# Altium PCB Pukk MVP Controller_PCB-v1.0.PcbDoc
Units mm, origin at the board's own origin, x right, y up, seen from the top; angles counter-clockwise.
Board outline 37 x 23 mm, 2 copper layers (Top Layer, Bottom Layer), stack 1.57 mm thick; 12 components, 10 nets, 29 pads, 3 vias.
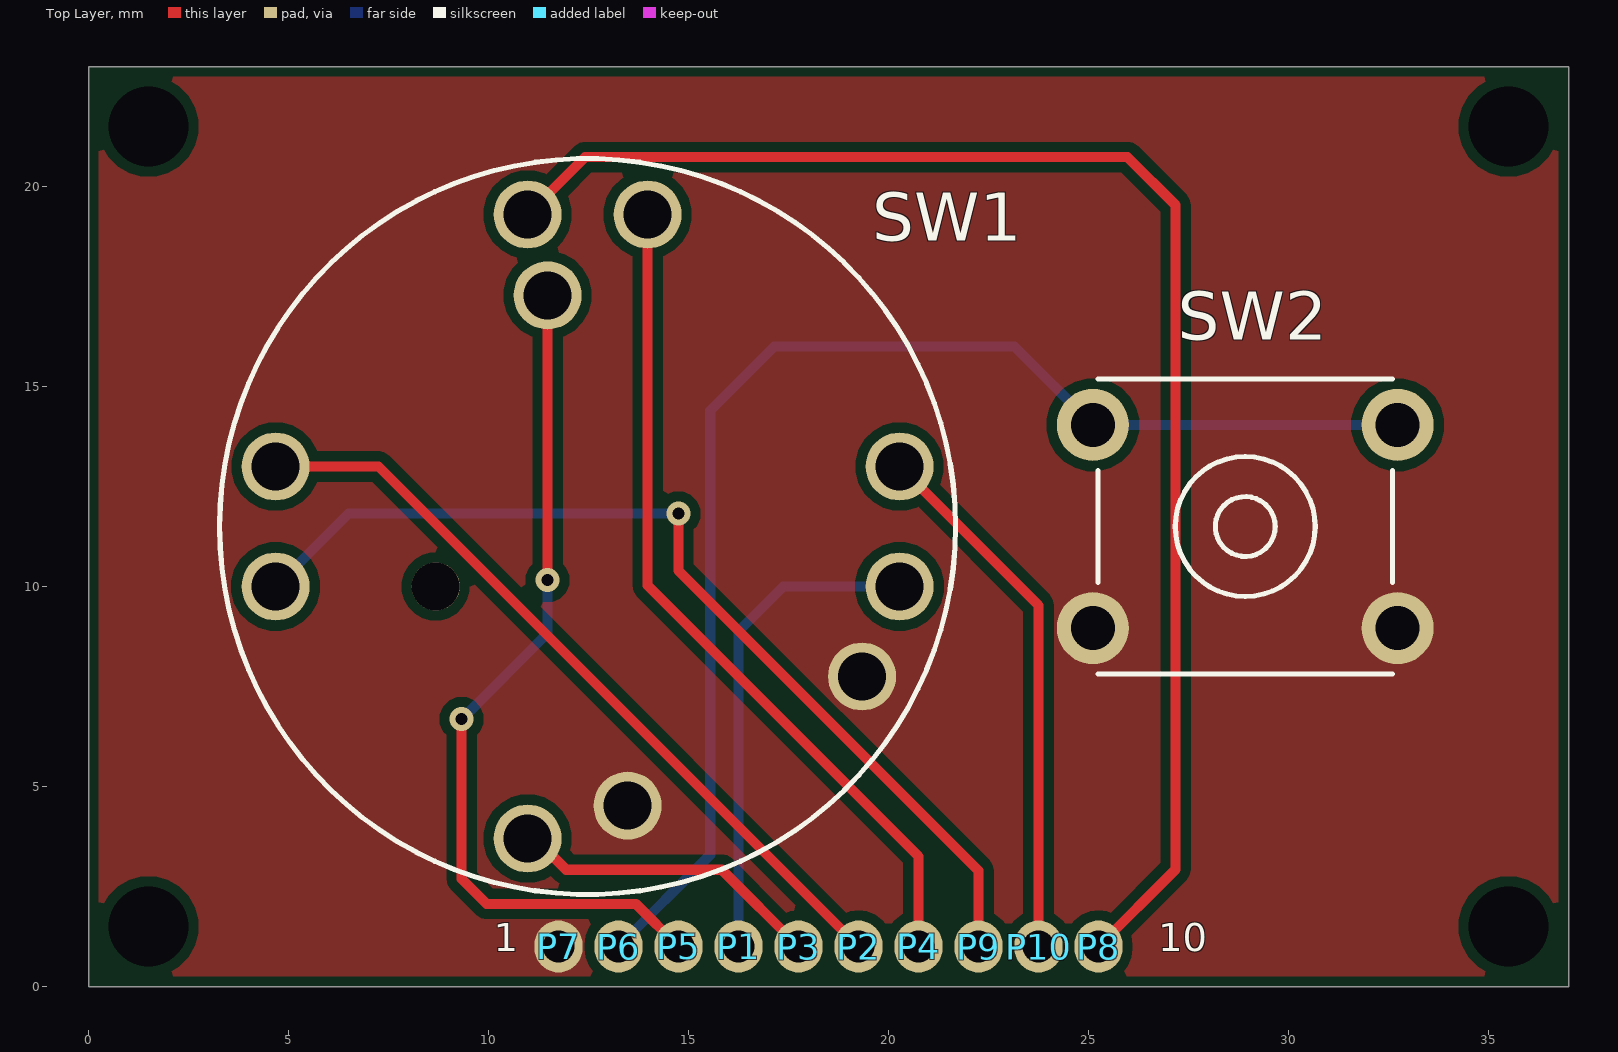
[diagram p0: Top Layer view]
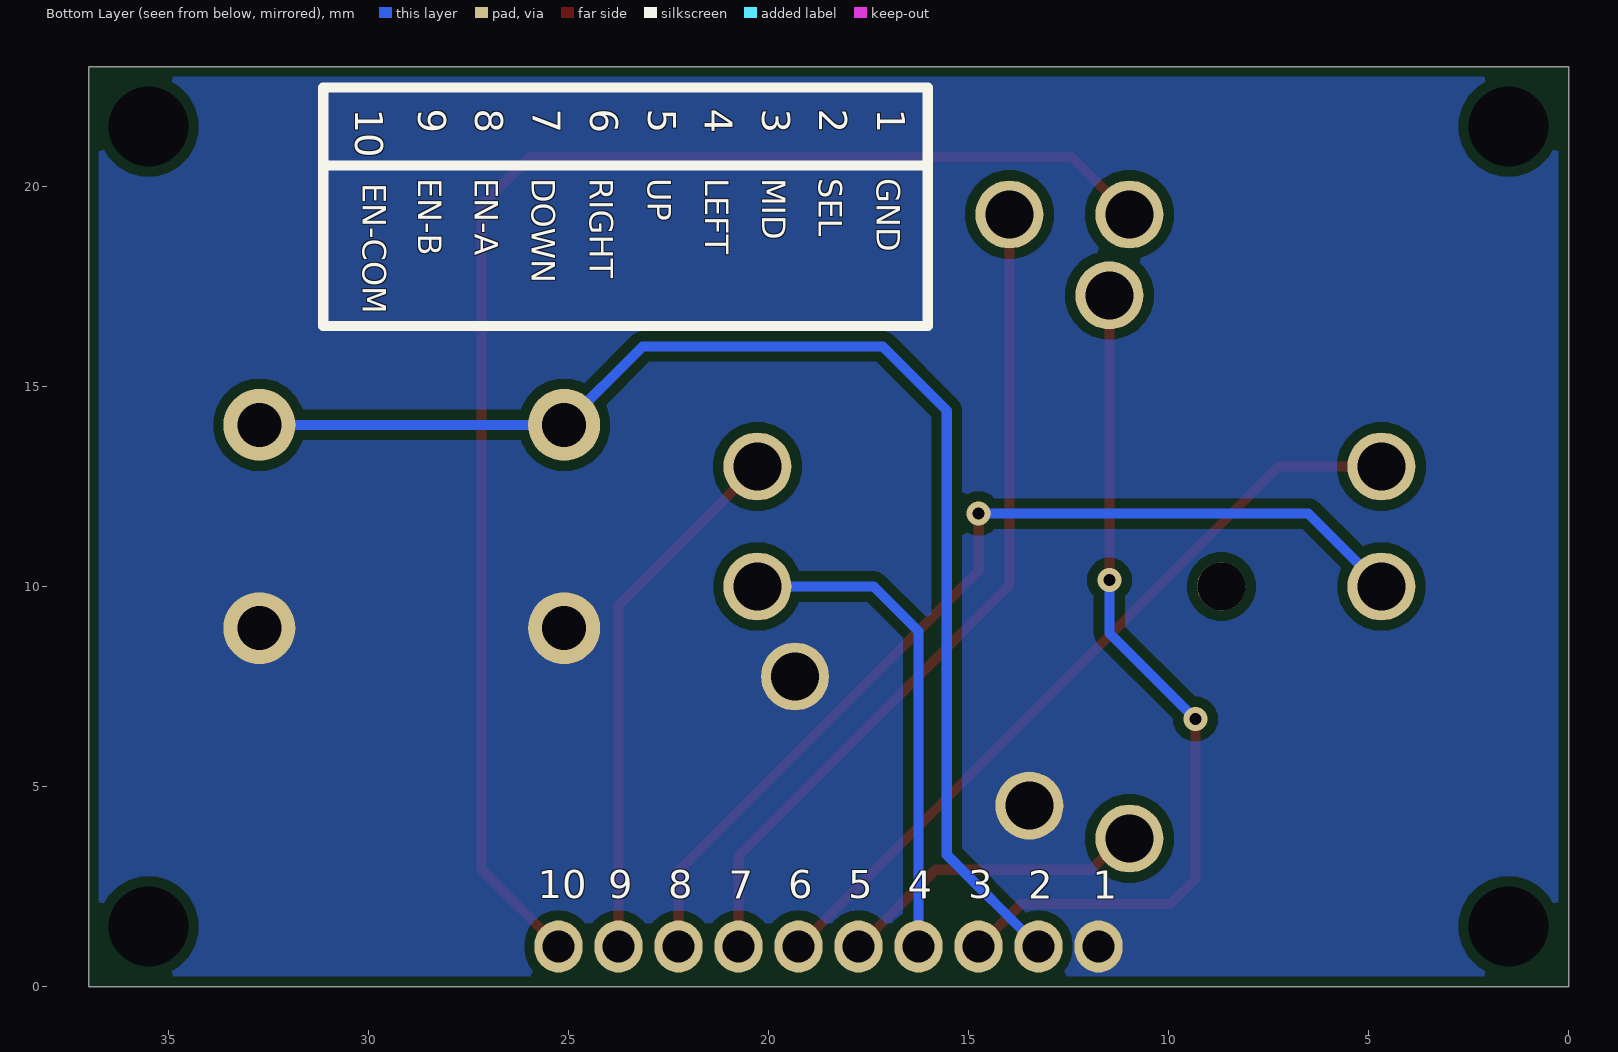
[diagram p1: Bottom Layer view, seen from below]

## Layer stack, top to bottom
Top Solder: solder mask 0.0102, Solder Resist, Dk 3.5
Top Layer: signal copper 0.035
Dielectric 1: dielectric 1.5, FR-4, Dk 4.8
Bottom Layer: signal copper 0.035
Bottom Solder: solder mask 0.0102, Solder Resist, Dk 3.5

## Board outline
0,0 0,23 37,23 37,0

## Design rules (kind name [scope] priority, off if disabled: settings)
BoardOutlineClearance [All] p1: gap=0 ignorepadtopadclearanceinfootprint=FALSE except(0.254: Poly-OutlineEdge)
Clearance [All] p1: gap=0.254 ignorepadtopadclearanceinfootprint=FALSE except(0: Arc-Hole Track-Hole SMDPad-Hole THPad-Hole Via-Hole Fill-Hole Poly-Hole Region-Hole Text-Hole)
Height [All] p1: minheight=0 maxheight=40 prefheight=12.7
HoleToHoleClearance [All] p1: gap=0 allowstackedmicrovias=TRUE
MinimumSolderMaskSliver [All] p1: minsoldermaskwidth=0
PolygonConnect [All] p1: connectstyle=Direct reliefconductorwidth=0.254 reliefentries=4 polygonreliefangle="90 Angle" airgapwidth=0.254
RoutingVias [All] p1: holewidth=0.3 width=0.6 viastyle="Through Hole" minholewidth=0.3 minwidth=0.6 maxholewidth=0.3 maxwidth=0.6
SilkToSilkClearance [All] p1: silktosilkclearance=0
SilkToSolderMaskClearance [IsPad] p1: minsilkscreentomaskgap=0 clearancetoexposedcopper=TRUE
SolderMaskExpansion [All] p1: expansion=0.102 istentingtop=FALSE
UnRoutedNet [All] p1: checkbadconnections=TRUE
Width [All] p1: maxlimit=0.254 minlimit=0.254 preferedwidth=0.254
24 further rules are at their usual default settings.

## Components (designator, comment, footprint, x,y, rotation, side; value= is the part's Value field where it differs from the comment)
P1 "0.5mm Test Pad" "0.5mm Test Pad"#1 16.25,1 r180 top
P2 "0.5mm Test Pad" "0.5mm Test Pad"#1 19.25,1 r180 top
P3 "0.5mm Test Pad" "0.5mm Test Pad"#1 17.75,1 r180 top
P4 "0.5mm Test Pad" "0.5mm Test Pad"#1 20.75,1 r180 top
P5 "0.5mm Test Pad" "0.5mm Test Pad"#1 14.75,1 r180 top
P6 "0.5mm Test Pad" "0.5mm Test Pad"#1 13.25,1 r180 top
P7 "0.5mm Test Pad" "0.5mm Test Pad"#1 11.75,1 r180 top
P8 "0.5mm Test Pad" "0.5mm Test Pad"#1 25.25,1 r180 top
P9 "0.5mm Test Pad" "0.5mm Test Pad"#1 22.25,1 r180 top
P10 "0.5mm Test Pad" "0.5mm Test Pad"#2 23.75,1 r270 top
SW1 "RKJXT1F42001" RKJXT1F42001 12.478,11.5 r0 top
SW2 "KSL0M512LFT" "KSL0M512 LFT" 28.918,11.5 r180 top

## Footprints (in the part's own frame and the unit in brackets; to place one, negate y for a bottom-side part, rotate by r counter-clockwise, add the part's x,y. Pads: shape width x height; smd on the part's side, far side on the other; paste and mask are expansions set on the pad)
"0.5mm Test Pad"#1 [mm]
  oval 1.2x1.3 hole 0.8: 1(0,0)
"0.5mm Test Pad"#2 [mm]
  oval 1.3x1.2 hole 0.8: 1(0,0)
"KSL0M512 LFT" [mm]
  round 1.8 hole 1.1: 1(-3.81,-2.54) 2(3.81,-2.54) 3(-3.81,2.54) 4(3.81,2.54)
  silkscreen extent -3.68,-3.68 3.68,3.68, body extent -4.47,-3.9 4.49,3.9, height 10.1
RKJXT1F42001 [mm]
  round 1.7 hole 1.2: A(-1.5,-7.8) B(7.8,-1.5) C(1.5,7.8) COM(-1,5.78) D(-7.8,1.5) EN_A(-7.8,-1.5) EN_B(7.8,1.5) EN_COM(-1.5,7.8) GND(6.86,-3.75) PUSH(1,-6.98)
  round 1.2 hole 1.2 unplated: ""(-3.8,-1.5)
  silkscreen extent -9.2,-9.2 9.2,9.2, body extent -8.6,-8.6 8.6,8.6, height 17.4

## Part data
P1 P2 P3 P4 P5 P6 P7 P8 P9 P10: "Test pad"
SW1: "Electromechanical Switch 4-Directional Stick Switch 0.01A Bulk", Manufacturer="Alps Alpine", Supplier Part Number=688-RKJXT1F42001, Category="Pushbutton Switches", ComponentLink1Description=https://datasheet.ciiva.com/16197/rkjxt-16197381.pdf?src-supplier=Onlinecomponents.com, ComponentLink1URL=https://datasheet.ciiva.com/16197/rkjxt-16197381.pdf?src-supplier=Onlinecomponents.com, Item Type=Switch, Manufacturer Part Number=RKJXT1F42001, Pricing="1=8.44, 10=7.1, 25=6.33, 50=6.33, 100=5.99, 250=5.75, 1000=5.75, 10000=5.75 (USD)", RoHS=Yes, Stock=1987, Supplier=Mouser
SW2: "SWITCH TACTILE SPST-NO 0.05A 32V", Manufacturer="ITT C&K", Supplier Part Number=401-1837-ND, ComponentLink1Description=https://datasheet.ciiva.com/2901/ksa-ksl-mkii-2901962.pdf?src-supplier=Digikey, ComponentLink1URL=https://datasheet.ciiva.com/2901/ksa-ksl-mkii-2901962.pdf?src-supplier=Digikey, Item Type="Tactile Switches", Manufacturer Part Number=KSL0M512LFT, Pricing="1=0.84, 10=0.718, 25=0.6684, 100=0.5961, 250=0.55216, 500=0.52152, 1000=0.49338, 2500=0.46016, 5000=0.43804 (USD)", RoHS=Yes, Stock=9888, Supplier=Digikey

## Free pads (board coordinates)
  oval 0x1.524 hole 2 unplated: "MH "(1.5,1.5)
  oval 1.524x0 hole 2 unplated: "MH "(1.5,21.5) "MH "(35.5,21.5) "MH "(35.5,1.5)

## Via types
v1: diameter 0.6, hole 0.3, Top Layer to Bottom Layer, 3 vias

## Nets (pads, with @x,y where several pads share a name; then routed paths per layer and width w, separated by ;. In a path a pad name is that pad's centre, name@x,y a point inside that pad or via, vN(x,y) a via of type N, cw(c..) or ccw(c..) an arc to the next point about the centre after c; other vN are vias at no path point)
BUTTON_CENTER#: P5.1 SW1.COM | length 21.6
  Top Layer w0.254: v1(9.327,6.685) 9.327,2.69 9.951,2.066 13.684,2.066 P5.1 ; v1(11.478,10.16) SW1.COM
  Bottom Layer w0.254: v1(9.327,6.685) 11.478,8.836 v1(11.478,10.16)
BUTTON_DOWN#: P4.1 SW1.C | length 21.1
  Top Layer w0.254: SW1.C 13.978,10.025 20.75,3.253 P4.1
BUTTON_LEFT#: P1.1 SW1.B | length 12.4
  Bottom Layer w0.254: P1.1 16.25,8.884 17.366,10 SW1.B
BUTTON_RIGHT#: P2.1 SW1.D | length 19.5
  Top Layer w0.254: SW1.D 7.25,13 P2.1
BUTTON_SELECT#: P6.1 SW2.1 SW2.2 | length 33
  Bottom Layer w0.254: P6.1 15.543,3.293 15.543,14.4 17.145,16.002 23.146,16.002 SW2.2 SW2.1
BUTTON_UP#: P3.1 SW1.A | length 7.9
  Top Layer w0.254: SW1.A 11.161,3.7 11.94,2.921 15.829,2.921 P3.1
EN_A: P9.1 SW1.EN_A | length 24.8
  Top Layer w0.254: v1(14.746,11.822) 14.746,10.398 22.25,2.894 P9.1
  Bottom Layer w0.254: SW1.EN_A 6.5,11.822 v1(14.746,11.822)
EN_B: P10.1 SW1.EN_B | length 13.4
  Top Layer w0.254: SW1.EN_B 23.75,9.528 P10.1
EN_COM: P8.1 SW1.EN_COM | length 36.6
  Top Layer w0.254: SW1.EN_COM 12.413,20.735 25.975,20.735 27.178,19.532 27.178,2.928 P8.1
GND: P7.1 SW1.GND SW1.PUSH SW2.3 SW2.4
pads on no net: SW1.

## Polygon pours and split planes (outlines as drawn)
GND on Bottom Layer "NONET_L01_P-001" (solid, pour order 0): 0,0 0,23 37,23 37,0
GND on Top Layer "NONET_L01_P-001" (solid, pour order 1): 0,0 0,23 37,23 37,0

## Silkscreen, mask and mechanical layers (free items; w line width, h text height)
Top Overlay:
  text "1" at 10.128,0.64 h1.2
  text "10" at 26.745,0.64 h1.2
Bottom Overlay:
  lines w0.254: 16.017,22.479 16.017,16.51 31.13,16.51 31.13,22.479 ; 16.017,22.479 31.13,22.479 ; 16.017,22.479 16.017,20.528 31.13,20.528 31.13,22.479 ; 16.017,22.479 31.13,22.479
  text "1" at 17.523,21.942 h1.2 r90
  text "2" at 18.969,21.943 h1.2 r90
  text "3" at 20.399,21.942 h1.2 r90
  text "4" at 21.827,21.942 h1.2 r90
  text "5" at 23.245,21.942 h1.2 r90
  text "6" at 24.694,21.942 h1.2 r90
  text "7" at 26.136,21.942 h1.2 r90
  text "8" at 27.575,21.942 h1.2 r90
  text "9" at 28.999,21.942 h1.2 r90
  text "10" at 30.572,21.942 h1.2 r90
  text "GND" at 17.493,20.211 h1 r90
  text "SEL" at 18.938,20.211 h1 r90
  text "MID" at 20.363,20.211 h1 r90
  text "LEFT" at 21.787,20.211 h1 r90
  text "UP" at 23.222,20.211 h1 r90
  text "RIGHT" at 24.668,20.211 h1 r90
  text "DOWN" at 26.114,20.211 h1 r90
  text "EN-A" at 27.544,20.211 h1 r90
  text "EN-B" at 28.963,20.211 h1 r90
  text "EN-COM" at 30.34,20.084 h1 r90
  text "1" at 11.892,1.957 h1.2
  text "2" at 13.506,1.957 h1.2
  text "3" at 15.001,1.97 h1.2
  text "4" at 16.516,1.957 h1.2
  text "5" at 18.005,1.97 h1.2
  text "6" at 19.504,1.97 h1.2
  text "7" at 20.999,1.957 h1.2
  text "8" at 22.503,1.97 h1.2
  text "9" at 24.003,1.97 h1.2
  text "10" at 25.763,1.97 h1.2
Board Outline:
  the board outline again, w0.127
Fabrication (Mech4):
  drawing of 191 lines, arcs and shapes, not listed
  text "Layer" at 60.207,22.733 h1.52
  text "Name" at 70.618,22.733 h1.52
  text "Material" at 94.234,22.733 h1.52
  text "Thickness" at 116.072,22.733 h1.52
  text "Constant" at 132.578,22.733 h1.52
  text "Board Layer Stack" at 147.052,22.733 h1.52
  text "Top Overlay" at 70.618,19.685 h1.52
  text "Top Solder" at 70.618,16.637 h1.52
  text "Solder Resist" at 94.234,16.637 h1.52
  text "0.010mm" at 116.072,16.637 h1.52
  text "3.5" at 132.578,16.637 h1.52
  text "1" at 60.207,13.589 h1.52
  text "Top Layer" at 70.618,13.589 h1.52
  text "0.035mm" at 116.072,13.589 h1.52
  text "Dielectric 1" at 70.618,10.541 h1.52
  text "FR-4" at 94.234,10.541 h1.52
  text "1.500mm" at 116.072,10.541 h1.52
  text "4.8" at 132.578,10.541 h1.52
  text "2" at 60.207,7.493 h1.52
  text "Bottom Layer" at 70.618,7.493 h1.52
  text "0.035mm" at 116.072,7.493 h1.52
  text "Bottom Solder" at 70.618,4.445 h1.52
  text "Solder Resist" at 94.234,4.445 h1.52
  text "0.010mm" at 116.072,4.445 h1.52
  text "3.5" at 132.578,4.445 h1.52
  text "Bottom Overlay" at 70.618,1.397 h1.52
  text "Total board thickness:" at 60.207,-1.651 h1.52
  text "1.590mm" at 116.072,-1.651 h1.52
Drill Drawing:
  circle w0.254: c4.207,59.838 r0.847
  lines w0.254: 3.36,39.941 5.054,39.941 5.054,41.635 3.36,41.635 3.36,39.941 ; 3.36,43.751 3.36,44.175 3.784,44.598 3.36,45.021 3.36,45.445 3.784,45.445 4.207,45.021 4.63,45.445 5.054,45.445 5.054,45.021 4.63,44.598 5.054,44.175 5.054,43.751 4.63,43.751 4.207,44.175 3.784,43.751 3.36,43.751 ; 3.36,47.985 3.784,47.985 3.784,47.561 4.63,47.561 4.63,47.985 5.054,47.985 5.054,48.831 4.63,48.831 4.63,49.255 3.784,49.255 3.784,48.831 3.36,48.831 3.36,47.985 ; 3.36,51.795 3.784,51.795 4.207,51.371 4.63,51.795 5.054,51.795 4.63,52.218 5.054,52.641 4.63,52.641 4.207,53.065 3.784,52.641 3.36,52.641 3.784,52.218 3.36,51.795 ; 3.36,55.181 4.207,55.605 5.054,55.181 4.63,56.028 5.054,56.875 4.207,56.451 3.36,56.875 3.784,56.028 3.36,55.181
  lines w0.381: 1.841,38.798 332.66,38.798 ; 1.841,61.658 332.66,61.658 ; 15.834,34.988 15.834,65.468 ; 29.546,34.988 29.546,65.468 ; 57.478,34.988 57.478,65.468 ; 70.327,34.988 70.327,65.468 ; 88.966,34.988 88.966,65.468 ; 127.054,34.988 127.054,65.468 ; 142.037,34.988 142.037,65.468 ; 160.98,34.988 160.98,65.468 ; 185.611,34.988 185.611,65.468 ; 207.296,34.988 207.296,65.468 ; 241.17,34.988 241.17,65.468 ; 275.044,34.988 275.044,65.468 ; 297.034,34.988 297.034,65.468 ; 1.841,34.988 332.66,34.988 332.66,65.468 1.841,65.468 1.841,34.988
  text "Symbol" at 4.127,62.801 h1.83
  text "Count" at 16.977,62.801 h1.83
  text "Hole Size" at 30.689,62.801 h1.83
  text "Plated" at 58.621,62.801 h1.83
  text "Hole Type" at 71.47,62.801 h1.83
  text "Drill Layer Pair" at 90.109,62.801 h1.83
  text "Via/Pad" at 128.197,62.801 h1.83
  text "Pad Shape" at 143.18,62.801 h1.83
  text "Template" at 162.123,62.801 h1.83
  text "Description" at 186.754,62.801 h1.83
  text "Hole Tolerance (+)" at 208.439,62.801 h1.83
  text "Hole Tolerance (-)" at 242.313,62.801 h1.83
  text "Hole Length" at 276.187,62.801 h1.83
  text "Routed Path Length" at 298.177,62.801 h1.83
  text "1" at 16.977,58.991 h1.52
  text "1.200mm (47.24mil)" at 30.689,58.991 h1.52
  text "NPTH" at 58.621,58.991 h1.52
  text "Round" at 71.47,58.991 h1.52
  text "Top Layer - Bottom Layer" at 90.109,58.991 h1.52
  text "Pad" at 128.197,58.991 h1.52
  text "Rounded" at 143.18,58.991 h1.52
  text "c120hn120" at 162.123,58.991 h1.52
  text "-" at 276.187,58.991 h1.52
  text "-" at 298.177,58.991 h1.52
  text "3" at 16.977,55.181 h1.52
  text "0.300mm (11.81mil)" at 30.689,55.181 h1.52
  text "PTH" at 58.621,55.181 h1.52
  text "Round" at 71.47,55.181 h1.52
  text "Top Layer - Bottom Layer" at 90.109,55.181 h1.52
  text "Via" at 128.197,55.181 h1.52
  text "Rounded" at 143.18,55.181 h1.52
  text "v60h30" at 162.123,55.181 h1.52
  text "-" at 276.187,55.181 h1.52
  text "-" at 298.177,55.181 h1.52
  text "4" at 16.977,51.371 h1.52
  text "1.100mm (43.31mil)" at 30.689,51.371 h1.52
  text "PTH" at 58.621,51.371 h1.52
  text "Round" at 71.47,51.371 h1.52
  text "Top Layer - Bottom Layer" at 90.109,51.371 h1.52
  text "Pad" at 128.197,51.371 h1.52
  text "Rounded" at 143.18,51.371 h1.52
  text "c180h110" at 162.123,51.371 h1.52
  text "-" at 276.187,51.371 h1.52
  text "-" at 298.177,51.371 h1.52
  text "4" at 16.977,47.561 h1.52
  text "2.000mm (78.74mil)" at 30.689,47.561 h1.52
  text "NPTH" at 58.621,47.561 h1.52
  text "Round" at 71.47,47.561 h1.52
  text "Top Layer - Bottom Layer" at 90.109,47.561 h1.52
  text "Pad" at 128.197,47.561 h1.52
  text "Rounded" at 143.18,47.561 h1.52
  text "r0_152hn200r100" at 162.123,47.561 h1.52
  text "-" at 276.187,47.561 h1.52
  text "-" at 298.177,47.561 h1.52
  text "10" at 16.977,43.751 h1.52
  text "0.800mm (31.50mil)" at 30.689,43.751 h1.52
  text "PTH" at 58.621,43.751 h1.52
  text "Round" at 71.47,43.751 h1.52
  text "Top Layer - Bottom Layer" at 90.109,43.751 h1.52
  text "Pad" at 128.197,43.751 h1.52
  text "Rounded" at 143.18,43.751 h1.52
  text "(Mixed)" at 162.123,43.751 h1.52
  text "-" at 276.187,43.751 h1.52
  text "-" at 298.177,43.751 h1.52
  text "10" at 16.977,39.941 h1.52
  text "1.200mm (47.24mil)" at 30.689,39.941 h1.52
  text "PTH" at 58.621,39.941 h1.52
  text "Round" at 71.47,39.941 h1.52
  text "Top Layer - Bottom Layer" at 90.109,39.941 h1.52
  text "Pad" at 128.197,39.941 h1.52
  text "Rounded" at 143.18,39.941 h1.52
  text "c170h120" at 162.123,39.941 h1.52
  text "-" at 276.187,39.941 h1.52
  text "-" at 298.177,39.941 h1.52
  text "32 Total" at 16.977,36.131 h1.52

## Dimensions
37,23 to 37,0 on Mechanical 1
0,23 to 37,23 on Mechanical 1